# Altium PCB fotolitoTop.PcbDoc (part 1 of 4)
Units mil, origin at the board's own origin, x right, y up, seen from the top; angles counter-clockwise.
Board outline 7874.02 x 11220.47 mil, 2 copper layers (Top Layer, Bottom Layer); 110 components, 0 nets, 500 pads, 136 vias.
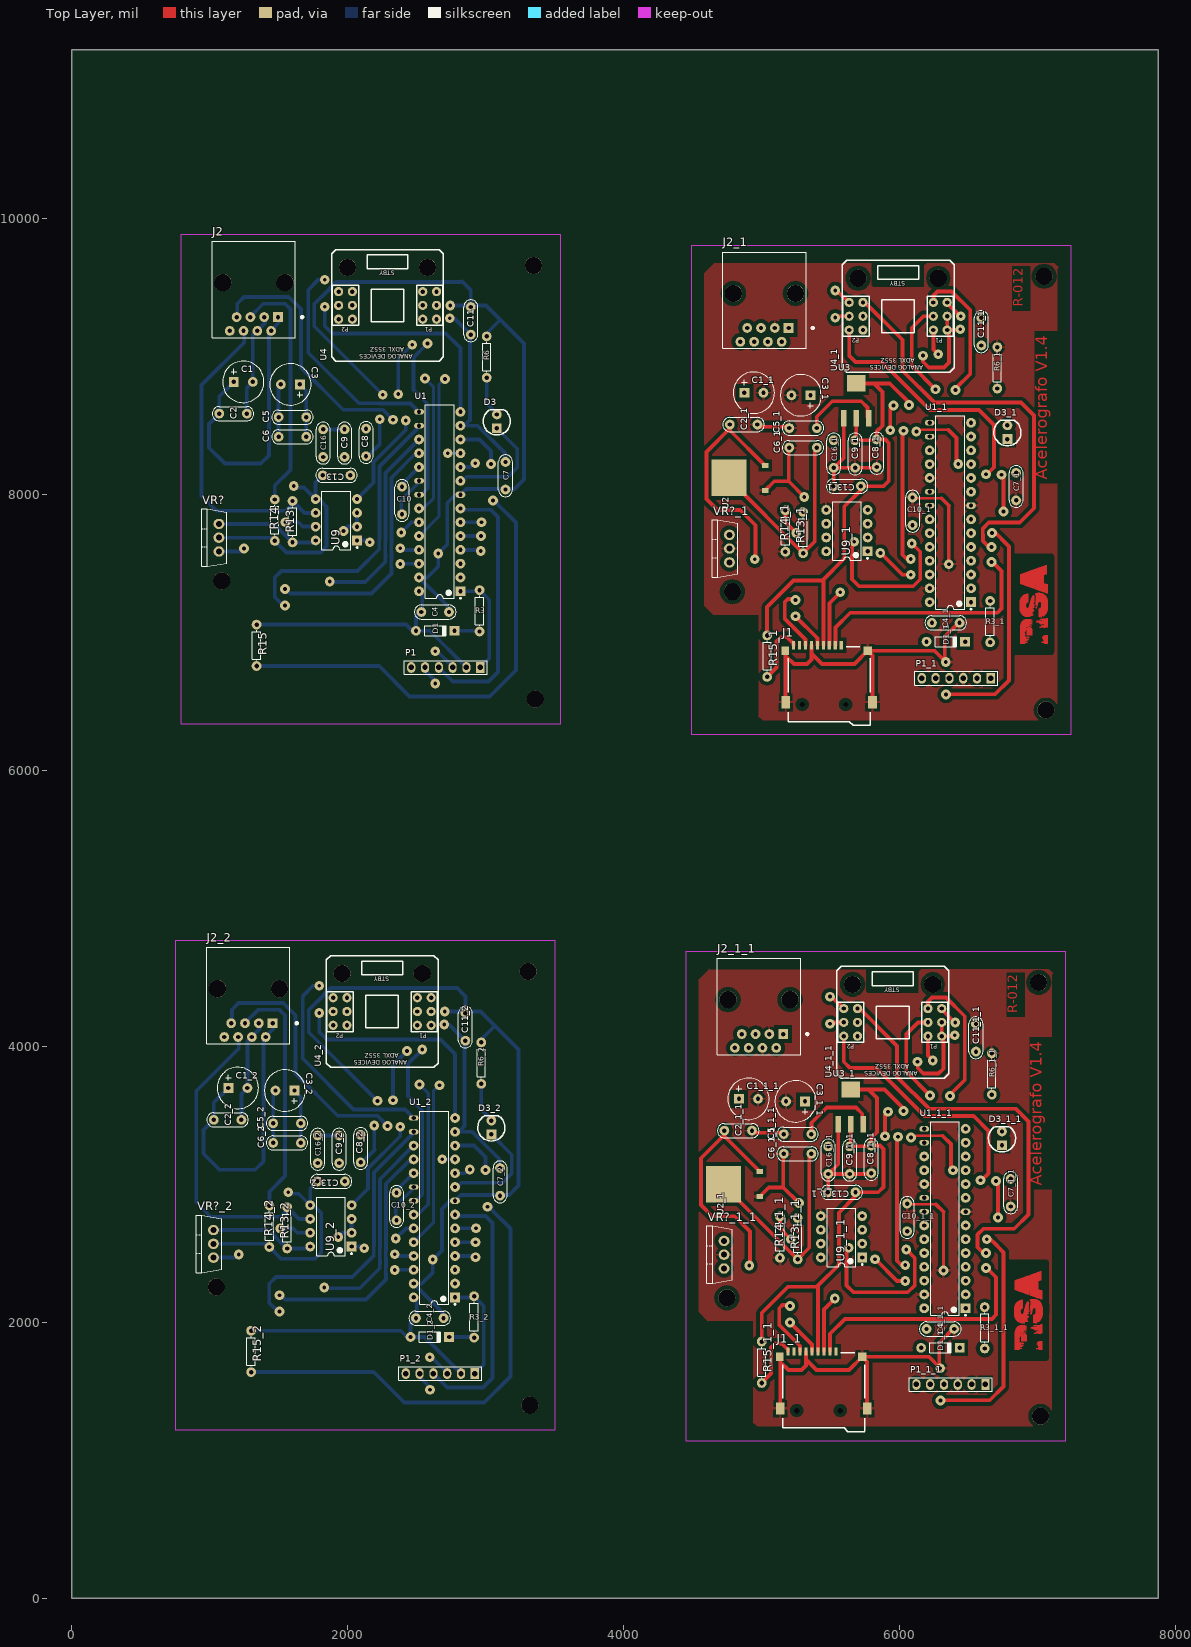
[diagram p0: Top Layer view]
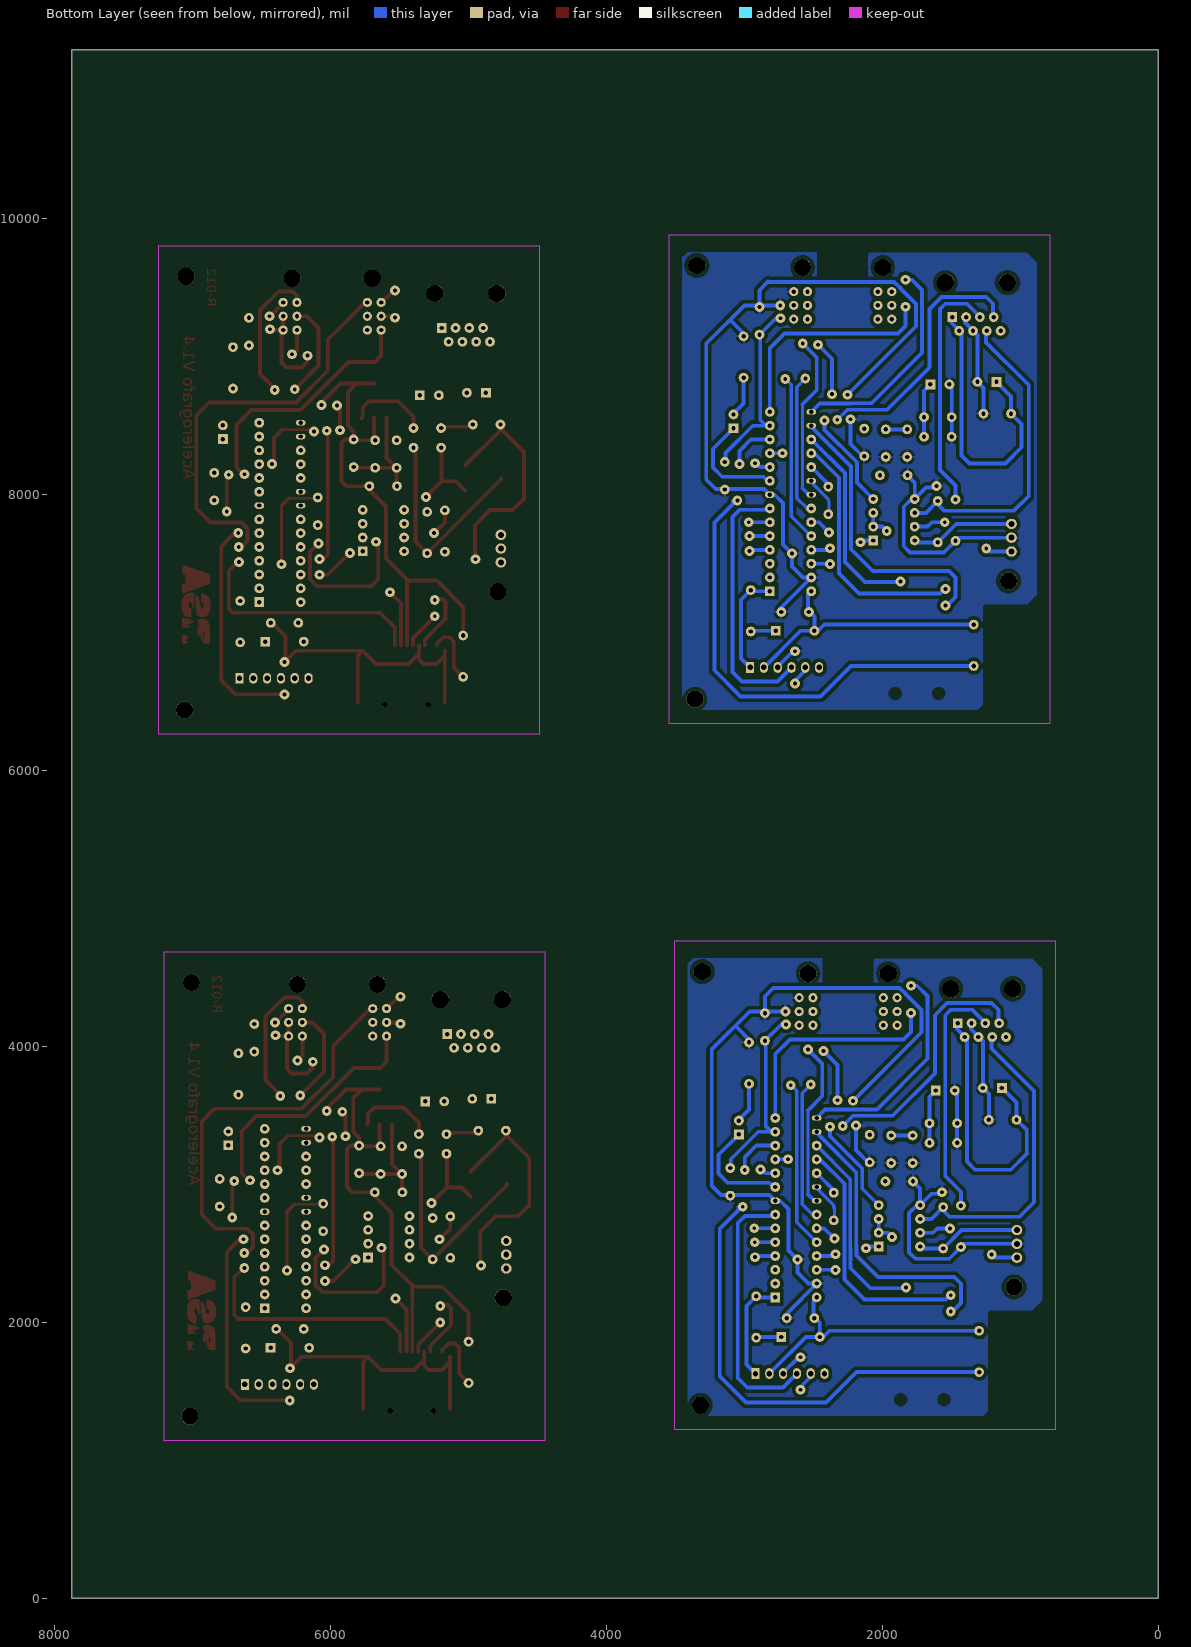
[diagram p1: Bottom Layer view, seen from below]

## Layer stack, top to bottom
Top Solder: solder mask 0.4, Solder Resist, Dk 3.5
Top Layer: signal copper 1.4
Dielectric 1: dielectric 12.6, FR-4, Dk 4.8
Bottom Layer: signal copper 1.4
Bottom Solder: solder mask 0.4, Solder Resist, Dk 3.5

## Board outline
0,0 7874.02,0 7874.02,11220.47 0,11220.47

## Design rules (kind name [scope] priority, off if disabled: settings)
Clearance [All] p1: gap=10
PolygonConnect [All] p1: connectstyle=Relief reliefconductorwidth=10 reliefentries=4 polygonreliefangle="90 Angle" airgapwidth=10
RoutingVias [All] p1: holewidth=28 width=50 viastyle="Through Hole" minholewidth=28 minwidth=50 maxholewidth=28 maxwidth=50
SolderMaskExpansion [All] p1: expansion=4
Width [All] p1: maxlimit=10 minlimit=10 preferedwidth=10
30 further rules are at their usual default settings.

## Components (designator, comment, footprint, x,y, rotation, side; value= is the part's Value field where it differs from the comment)
C1 "Cap" C100UFB 1173.16,8814.88 r0 top
C1_1 "Cap" C100UFB 4873.95,8736.13 r0 top (schematic designator C1)
C1_1_1 "Cap" C100UFB 4834.58,3618.02 r0 top (schematic designator C1)
C1_2 "Cap" C100UFB 1133.79,3696.76 r0 top (schematic designator C1)
C2 "Cap" RAD0.2 1067.41,8584.32 r0 top
C2_1 "Cap" RAD0.2 4768.2,8505.58 r0 top (schematic designator C2)
C2_1_1 "Cap" RAD0.2 4728.83,3387.47 r0 top (schematic designator C2)
C2_2 "Cap" RAD0.2 1028.04,3466.21 r0 top (schematic designator C2)
C3 "Cap" C100UFB 1651.98,8796.44 r180 top
C3_1 "Cap" C100UFB 5352.76,8717.7 r180 top (schematic designator C3)
C3_1_1 "Cap" C100UFB 5313.39,3599.59 r180 top (schematic designator C3)
C3_2 "Cap" C100UFB 1612.61,3678.33 r180 top (schematic designator C3)
C4 "Cap" RAD0.2 2532.57,7146.92 r0 top
C4_1 "Cap" RAD0.2 6233.36,7068.18 r0 top (schematic designator C4)
C4_1_1 "Cap" RAD0.2 6193.99,1950.07 r0 top (schematic designator C4)
C4_2 "Cap" RAD0.2 2493.2,2028.81 r0 top (schematic designator C4)
C5 "Cap" RAD0.2 1697.9,8559 r180 top
C5_1 "Cap" RAD0.2 5398.69,8480.26 r180 top (schematic designator C5)
C5_1_1 "Cap" RAD0.2 5359.32,3362.14 r180 top (schematic designator C5)
C5_2 "Cap" RAD0.2 1658.53,3440.89 r180 top (schematic designator C5)
C6 "Cap" RAD0.2 1697.9,8416.84 r180 top
C6_1 "Cap" RAD0.2 5398.69,8338.1 r180 top (schematic designator C6)
C6_1_1 "Cap" RAD0.2 5359.32,3219.99 r180 top (schematic designator C6)
C6_2 "Cap" RAD0.2 1658.53,3298.73 r180 top (schematic designator C6)
C7 "Cap" RAD0.2 3142.22,8234.62 r270 top
C7_1 "Cap" RAD0.2 6843.01,8155.88 r270 top (schematic designator C7)
C7_1_1 "Cap" RAD0.2 6803.64,3037.77 r270 top (schematic designator C7)
C7_2 "Cap" RAD0.2 3102.85,3116.51 r270 top (schematic designator C7)
C8 "Cap" RAD0.2 2131.66,8476.05 r270 top
C8_1 "Cap" RAD0.2 5832.45,8397.31 r270 top (schematic designator C8)
C8_1_1 "Cap" RAD0.2 5793.08,3279.2 r270 top (schematic designator C8)
C8_2 "Cap" RAD0.2 2092.29,3357.94 r270 top (schematic designator C8)
C9 "Cap" RAD0.2 1975.76,8470.67 r270 top
C9_1 "Cap" RAD0.2 5676.55,8391.93 r270 top (schematic designator C9)
C9_1_1 "Cap" RAD0.2 5637.18,3273.82 r270 top (schematic designator C9)
C9_2 "Cap" RAD0.2 1936.39,3352.56 r270 top (schematic designator C9)
C10 "Cap" RAD0.2 2392.01,7855.62 r90 top
C10_1 "Cap" RAD0.2 6092.8,7776.88 r90 top (schematic designator C10)
C10_1_1 "Cap" RAD0.2 6053.43,2658.77 r90 top (schematic designator C10)
C10_2 "Cap" RAD0.2 2352.64,2737.51 r90 top (schematic designator C10)
C11 "Cap" RAD0.2 2890.7,9157.49 r90 top
C11_1 "Cap" RAD0.2 6591.49,9078.75 r90 top (schematic designator C11)
C11_1_1 "Cap" RAD0.2 6552.12,3960.64 r90 top (schematic designator C11)
C11_2 "Cap" RAD0.2 2851.33,4039.38 r90 top (schematic designator C11)
C13 "Cap" RAD0.2 2017.55,8137.75 r180 top
C13_1 "Cap" RAD0.2 5718.33,8059.01 r180 top (schematic designator C13)
C13_1_1 "Cap" RAD0.2 5678.96,2940.9 r180 top (schematic designator C13)
C13_2 "Cap" RAD0.2 1978.18,3019.64 r180 top (schematic designator C13)
C16 "Cap" RAD0.2 1820.28,8470.67 r270 top
C16_1 "Cap" RAD0.2 5521.06,8391.93 r270 top (schematic designator C16)
C16_1_1 "Cap" RAD0.2 5481.69,3273.82 r270 top (schematic designator C16)
C16_2 "Cap" RAD0.2 1780.91,3352.56 r270 top (schematic designator C16)
D1 "1N914" DO-35 2632.94,7010.51 r0 top
D1_1 "1N914" DO-35 6333.72,6931.77 r0 top (schematic designator D1)
D1_1_1 "1N914" DO-35 6294.35,1813.66 r0 top (schematic designator D1)
D1_2 "1N914" DO-35 2593.57,1892.4 r0 top (schematic designator D1)
D3 "LED3" LED2 3079.37,8528.59 r90 top
D3_1 "LED3" LED2 6780.16,8449.85 r90 top (schematic designator D3)
D3_1_1 "LED3" LED2 6740.79,3331.74 r90 top (schematic designator D3)
D3_2 "LED3" LED2 3040,3410.48 r90 top (schematic designator D3)
J1 "ValueValueAux" microSD 5576.26,6905.66 r180 top
J1_1 "ValueValueAux" microSD 5536.89,1787.55 r180 top (schematic designator J1)
J2 "54602-908LF" *AMPHENOL_54602-908LF 1318.35,9534.37 r180 top
J2_1 "54602-908LF" *AMPHENOL_54602-908LF 5019.14,9455.63 r180 top (schematic designator J2)
J2_1_1 "54602-908LF" *AMPHENOL_54602-908LF 4979.77,4337.52 r180 top (schematic designator J2)
J2_2 "54602-908LF" *AMPHENOL_54602-908LF 1278.98,4416.26 r180 top (schematic designator J2)
P1 "Grabador" HDR1X6 2958.97,6745.02 r180 top
P1_1 "Grabador" HDR1X6 6659.76,6666.28 r180 top (schematic designator P1)
P1_1_1 "Grabador" HDR1X6 6620.39,1548.16 r180 top (schematic designator P1)
P1_2 "Grabador" HDR1X6 2919.6,1626.91 r180 top (schematic designator P1)
R3 "Res1" AXIAL-0.3#1 2954.09,7155.53 r270 top
R3_1 "Res1" AXIAL-0.3#1 6654.87,7076.79 r270 top (schematic designator R3)
R3_1_1 "Res1" AXIAL-0.3#1 6615.5,1958.68 r270 top (schematic designator R3)
R3_2 "Res1" AXIAL-0.3#1 2914.72,2037.42 r270 top (schematic designator R3)
R6 "Res1" AXIAL-0.3#1 3006,8995.22 r90 top
R6_1 "Res1" AXIAL-0.3#1 6706.79,8916.48 r90 top (schematic designator R6)
R6_1_1 "Res1" AXIAL-0.3#1 6667.42,3798.37 r90 top (schematic designator R6)
R6_2 "Res1" AXIAL-0.3#1 2966.63,3877.11 r90 top (schematic designator R6)
R13 "Res1" AXIAL-0.3#1 1598.72,7801.38 r270 top
R13_1 "Res1" AXIAL-0.3#1 5299.51,7722.64 r270 top (schematic designator R13)
R13_1_1 "Res1" AXIAL-0.3#1 5260.14,2604.53 r270 top (schematic designator R13)
R13_2 "Res1" AXIAL-0.3#1 1559.35,2683.27 r270 top (schematic designator R13)
R14 "Res1" AXIAL-0.3#1 1470.21,7812.39 r270 top
R14_1 "Res1" AXIAL-0.3#1 5171,7733.65 r270 top (schematic designator R14)
R14_1_1 "Res1" AXIAL-0.3#1 5131.63,2615.54 r270 top (schematic designator R14)
R14_2 "Res1" AXIAL-0.3#1 1430.84,2694.28 r270 top (schematic designator R14)
R15 "Res1" AXIAL-0.3#2 1337.91,6905.33 r90 top
R15_1 "Res1" AXIAL-0.3#2 5038.69,6826.59 r90 top (schematic designator R15)
R15_1_1 "Res1" AXIAL-0.3#2 4999.32,1708.48 r90 top (schematic designator R15)
R15_2 "Res1" AXIAL-0.3#2 1298.54,1787.22 r90 top (schematic designator R15)
U1 "DSPIC33EP256MC202-I/SP" MCHP-SPDIP-SP28 2665.75,7947.25 r180 top
U1_1 "DSPIC33EP256MC202-I/SP" MCHP-SPDIP-SP28 6366.53,7868.51 r180 top (schematic designator U1)
U1_1_1 "DSPIC33EP256MC202-I/SP" MCHP-SPDIP-SP28 6327.16,2750.4 r180 top (schematic designator U1)
U1_2 "DSPIC33EP256MC202-I/SP" MCHP-SPDIP-SP28 2626.38,2829.14 r180 top (schematic designator U1)
U2 "LM1117DT-5.0" *TO228P970X238-3N 4768.2,8118.51 r90 top
U2_1 "LM1117DT-5.0" *TO228P970X238-3N 4728.83,3000.4 r90 top (schematic designator U2)
U3 "LD33V" SOT-223 5593.63,8552.13 r0 top
U3_1 "LD33V" SOT-223 5554.26,3434.02 r0 top (schematic designator U3)
U4 "ADXL355Z" ADXL355Z 2287.52,9369.24 r180 top
U4_1 "ADXL355Z" ADXL355Z 5988.31,9290.5 r180 top (schematic designator U4)
U4_1_1 "ADXL355Z" ADXL355Z 5948.94,4172.39 r180 top (schematic designator U4)
U4_2 "ADXL355Z" ADXL355Z 2248.15,4251.13 r180 top (schematic designator U4)
U9 "MAX485" MAX485 2066.12,7665.49 r90 top
U9_1 "MAX485" MAX485 5766.91,7586.75 r90 top (schematic designator U9)
U9_1_1 "MAX485" MAX485 5727.54,2468.64 r90 top (schematic designator U9)
U9_2 "MAX485" MAX485 2026.75,2547.38 r90 top (schematic designator U9)
VR? "Volt Reg" TO-220V 1064.86,7585.27 r90 top
VR?_1 "Volt Reg" TO-220V 4765.65,7506.53 r90 top (schematic designator VR?)
VR?_1_1 "Volt Reg" TO-220V 4726.28,2388.42 r90 top (schematic designator VR?)
VR?_2 "Volt Reg" TO-220V 1025.49,2467.16 r90 top (schematic designator VR?)

## Footprints (in the part's own frame and the unit in brackets; to place one, negate y for a bottom-side part, rotate by r counter-clockwise, add the part's x,y. Pads: shape width x height; smd on the part's side, far side on the other; paste and mask are expansions set on the pad)
*AMPHENOL_54602-908LF [mm]
  rect 1.8x1.8 hole 0.8: 1(-4.445,6.35)
  round 1.8 hole 0.8: 2(-3.175,8.89) 3(-1.905,6.35) 4(-0.635,8.89) 5(0.635,6.35) 6(1.905,8.89) 7(3.175,6.35) 8(4.445,8.89)
  round 3.2 hole 3.2 unplated: None(-5.715,0) None(5.715,0)
  silkscreen extent -9.09,-7.62 7.65,10.12
*TO228P970X238-3N [mil]
  rect 35x48 smd: 1(-90,-256) 3(90,-256)
  rect 265x256 smd: 2(0,6)
ADXL355Z [mm]
  round 1.7 hole 0.8: 1(-6.48,2.54) 2(-6.48,0) 3(-6.48,-2.54) 4(-9.02,2.54) 5(-9.02,0) 6(-9.02,-2.54) 7(9.02,2.54) 8(9.02,0) 9(9.02,-2.54) 10(6.48,2.54) 11(6.48,0) 12(6.48,-2.54)
  round 0 all layers, no hole paste+0 mask+0: ""(-7.375,7) ""(7.375,7)
  round 3.15 hole 3.15: ""(-7.375,-7) ""(7.375,-7)
  silkscreen extent -10.29,-10.29 10.29,10.29
AXIAL-0.3#1 [mm] "Axial Device, Thru-Hole; 2 Leads; 0.3 in Pin Spacing"
  round 1.8 hole 0.8: 1(-3.81,0) 2(3.81,0)
  silkscreen extent -2.77,-0.76 2.77,0.76
AXIAL-0.3#2 [mm] "Axial Device, Thru-Hole; 2 Leads; 0.3 in Pin Spacing"
  round 1.8 hole 0.85 unplated: 1(-3.81,0) 2(3.81,0)
  silkscreen extent -2.77,-0.76 2.77,0.76
C100UFB [mm]
  rect 1.8x1.8 hole 0.8: 1(0,0)
  round 1.8 hole 0.8: 2(3.5,0)
  silkscreen extent -2.07,-3.81 5.55,3.81
DO-35 [mm] "Diode, Axial; Body 3.8 x 1.9 mm (LxDia. max), Lead Dia. 0.53 mm (max)"
  round 1.8 hole 0.8: 1(-3.55,0)
  rect 1.8x1.8 hole 0.8: 2(3.55,0)
  silkscreen extent -1.95,-0.95 2.05,0.95
HDR1X6 [mm] "Connector; Header; 6 Position"
  rect 1.5x2 hole 1: 1(0,0)
  oval 1.5x2 hole 1: 2(2.54,0) 3(5.08,0) 4(7.62,0) 5(10.16,0) 6(12.7,0)
  silkscreen extent -1.27,-1.27 13.97,1.27
LED2 [mm]
  rect 1.8x1.8 hole 0.8: 1(-1.27,0)
  round 1.8 hole 0.8: 2(1.27,0)
  silkscreen extent -2.5,-2.5 2.17,2.5
MAX485 [mm]
  rect 1.8x1.8 hole 0.8: 1(0,0)
  round 1.8 hole 0.8: 2(2.54,0) 3(5.08,0) 4(7.62,0) 5(7.62,7.62) 6(5.08,7.62) 7(2.54,7.62) 8(0,7.62)
  silkscreen extent -1.69,-0.13 9.1,6.46, body extent -1.64,0.2 9,7.41, height 5.34
MCHP-SPDIP-SP28 [mm] "DIP, 28-Leads, Body 34.86x6.79mm, Pitch 2.54mm"
  rect 1.8x1.8 hole 0.8: 1(-3.81,16.51)
  round 1.8 hole 0.8: 2(-3.81,13.97) 3(-3.81,11.43) 4(-3.81,8.89) 5(-3.81,6.35) 6(-3.81,3.81) 7(-3.81,1.27) 9(-3.81,-3.81) 10(-3.81,-6.35) 11(-3.81,-8.89) 12(-3.81,-11.43) 13(-3.81,-13.97) 14(-3.81,-16.51) 17(3.81,-11.43) 18(3.81,-8.89) 19(3.81,-6.35) 22(3.81,1.27) 23(3.81,3.81) 24(3.81,6.35) 25(3.81,8.89) 26(3.81,11.43) 27(3.81,13.97) 28(3.81,16.51)
  oval 1.8x1.2 hole 0.8: 8(-3.81,-1.27)
  oval 1.8x1 hole 0.8: 15(3.81,-16.51) 16(3.81,-13.97) 20(3.81,-3.81) 21(3.81,-1.27)
  silkscreen extent -3.94,-17.8 2.65,17.93, body extent -3.95,-17.77 3.95,17.77, height 5.08
microSD [mm]
  rect 0.6x1.5 smd: 1(0,0) 2(1.1,0) 3(2.2,0) 4(3.3,0) 5(4.4,0) 6(5.5,0) 7(6.6,0) 8(7.7,0) 9(8.8,0)
  rect 1.6x2.26 smd: 10(-5.75,10.5) 10(10.25,10.5)
  rect 1.6x1.6 smd: 10(-4.85,1)
  rect 1.4x1.6 smd: 10(10.3,1)
  round 0.8 hole 1: ""(-0.8,10.9) ""(7.2,10.9)
  silkscreen extent -5.33,0.25 9.8,14.75, body extent -5.75,-0.35 10.25,14.9, height 1.95
RAD0.2 [mm]
  round 1.8 hole 0.8: 1(0,0) 2(5.08,0)
  silkscreen extent -1.3,-1.3 6.38,1.3
SOT-223 [mm]
  rect 1x3 smd: 1(4.6,0) 2(0,0) 3(2.3,0)
  rect 3.4x3 smd: 3(2.3,6.4)
  body extent -1.2,1.41 5.8,5, height 1.1
TO-220V [mm] "D2-PAK, 4-Leads, Body 8.8x10.4mm, Pitch 2.54mm, Lead Span 15.1mm, IPC Medium Density"
  oval 1.9x2 hole 1.1: 1(0,0) 2(2.54,0) 3(5.08,0)
  silkscreen extent -2.75,-1.48 7.83,3.18, body extent -2.56,-1.8 7.6,2.8, height 18.9

## Part data
C1 C1_1 C1_1_1 C1_2 C2 C2_1 C2_1_1 C2_2 C3 C3_1 C3_1_1 C3_2 C4 C4_1 C4_1_1 C4_2 C5 C5_1 C5_1_1 C5_2 C6 C6_1 C6_1_1 C6_2 C7 C7_1 C7_1_1 C7_2 C8 C8_1 C8_1_1 C8_2 C9 C9_1 C9_1_1 C9_2 C10 C10_1 C10_1_1 C10_2 C11 C11_1 C11_1_1 C11_2 C13 C13_1 C13_1_1 C13_2 C16 C16_1 C16_1_1 C16_2: "Capacitor"
D1 D1_1 D1_1_1 D1_2: library part "Diode 1N914", "High Conductance Fast Diode"
D3 D3_1 D3_1_1 D3_2: "Typical BLUE SiC LED"
J1 J1_1: library part MICROSD, "=Description"
J2 J2_1 J2_1_1 J2_2: "Jack Modular Connector 8p8c _RJ45, Ethernet_ 90° Angle _Right_ Unshielded Cat3"
P1 P1_1 P1_1_1 P1_2: library part "Header 6", "Header, 6-Pin"
R3 R3_1 R3_1_1 R3_2 R6 R6_1 R6_1_1 R6_2 R13 R13_1 R13_1_1 R13_2 R14 R14_1 R14_1_1 R14_2 R15 R15_1 R15_1_1 R15_2: "Resistor"
U1 U1_1 U1_1_1 U1_2: "16-Bit Microcontroller and Digital Signal Controller with High-Speed PWM, Op Amps and Advanced Analog, 70 MIPS, 21 I/O, GPIO, -40 to 85 degC, 28-pin SPDIP (SP28), Tube"
U2 U2_1: "Linear Voltage Regulator IC 1 Output 800mA TO-252-3"
U3 U3_1: "High-Performance 16-bit Digital Signal Controller, 24 KB Flash, 2 KB SRAM, 1 KB EEPROM, 40-Pin PDIP, Industrial Temperature"
VR? VR?_1 VR?_1_1 VR?_2: "Voltage Regulator"

## Free pads (board coordinates)
  round 124.02 hole 124.02: ""(1046.21,2254.54) ""(1085.58,7372.65) ""(3306.05,4540.86) ""(3318.78,1397.57) ""(3345.42,9658.97) ""(3358.15,6515.68) ""(4747,2175.8) ""(4786.37,7293.91) ""(7006.84,4462.12) ""(7019.57,1318.83) ""(7046.21,9580.23) ""(7058.94,6436.94)

## Via types
v1: diameter 70.87, hole 27.56, Top Layer to Bottom Layer, 136 vias

## Nets (pads, with @x,y where several pads share a name; then routed paths per layer and width w, separated by ;. In a path a pad name is that pad's centre, name@x,y a point inside that pad or via, vN(x,y) a via of type N, cw(c..) or ccw(c..) an arc to the next point about the centre after c; other vN are vias at no path point)
pads on no net: C1.1 C1.2 C1_1.1 C1_1.2 C1_1_1.1 C1_1_1.2 C1_2.1 C1_2.2 C2.1 C2.2 C2_1.1 C2_1.2 C2_1_1.1 C2_1_1.2 C2_2.1 C2_2.2 C3.1 C3.2 C3_1.1 C3_1.2 C3_1_1.1 C3_1_1.2 C3_2.1 C3_2.2 C4.1 C4.2 C4_1.1 C4_1.2 C4_1_1.1 C4_1_1.2 C4_2.1 C4_2.2 C5.1 C5.2 C5_1.1 C5_1.2 C5_1_1.1 C5_1_1.2 C5_2.1 C5_2.2 C6.1 C6.2 C6_1.1 C6_1.2 C6_1_1.1 C6_1_1.2 C6_2.1 C6_2.2 C7.1 C7.2 C7_1.1 C7_1.2 C7_1_1.1 C7_1_1.2 C7_2.1 C7_2.2 C8.1 C8.2 C8_1.1 C8_1.2 C8_1_1.1 C8_1_1.2 C8_2.1 C8_2.2 C9.1 C9.2 C9_1.1 C9_1.2 C9_1_1.1 C9_1_1.2 C9_2.1 C9_2.2 C10.1 C10.2 C10_1.1 C10_1.2 C10_1_1.1 C10_1_1.2 C10_2.1 C10_2.2 C11.1 C11.2 C11_1.1 C11_1.2 C11_1_1.1 C11_1_1.2 C11_2.1 C11_2.2 C13.1 C13.2 C13_1.1 C13_1.2 C13_1_1.1 C13_1_1.2 C13_2.1 C13_2.2 C16.1 C16.2 C16_1.1 C16_1.2 C16_1_1.1 C16_1_1.2 C16_2.1 C16_2.2 D1.1 D1.2 D1_1.1 D1_1.2 D1_1_1.1 D1_1_1.2 D1_2.1 D1_2.2 D3.1 D3.2 D3_1.1 D3_1.2 D3_1_1.1 D3_1_1.2 D3_2.1 D3_2.2 J1. J1.1 J1.2 J1.3 J1.4 J1.5 J1.6 J1.7 J1.8 J1.9 J1.10 J1_1. J1_1.1 J1_1.2 J1_1.3 J1_1.4 J1_1.5 J1_1.6 J1_1.7 J1_1.8 J1_1.9 J1_1.10 J2.1 J2.2 J2.3 J2.4 J2.5 J2.6 J2.7 J2.8 J2.None J2_1.1 J2_1.2 J2_1.3 J2_1.4 J2_1.5 J2_1.6 J2_1.7 J2_1.8 J2_1.None J2_1_1.1 J2_1_1.2 J2_1_1.3 J2_1_1.4 J2_1_1.5 J2_1_1.6 J2_1_1.7 J2_1_1.8 J2_1_1.None J2_2.1 J2_2.2 J2_2.3 J2_2.4 J2_2.5 J2_2.6 J2_2.7 J2_2.8 J2_2.None P1.1 P1.2 P1.3 P1.4 P1.5 P1.6 P1_1.1 P1_1.2 P1_1.3 P1_1.4 P1_1.5 P1_1.6 P1_1_1.1 P1_1_1.2 P1_1_1.3 P1_1_1.4 P1_1_1.5 P1_1_1.6 P1_2.1 P1_2.2 P1_2.3 P1_2.4 P1_2.5 P1_2.6 R3.1 R3.2 R3_1.1 R3_1.2 R3_1_1.1 R3_1_1.2 R3_2.1 R3_2.2 R6.1 R6.2 R6_1.1 R6_1.2 R6_1_1.1 R6_1_1.2 R6_2.1 R6_2.2 R13.1 R13.2 R13_1.1 R13_1.2 R13_1_1.1 R13_1_1.2 R13_2.1 R13_2.2 R14.1 R14.2 R14_1.1 R14_1.2 R14_1_1.1 R14_1_1.2 R14_2.1 R14_2.2 R15.1 R15.2 R15_1.1 R15_1.2 R15_1_1.1 R15_1_1.2 R15_2.1 R15_2.2 U1.1 U1.2 U1.3 U1.4 U1.5 U1.6 U1.7 U1.8 U1.9 U1.10 U1.11 U1.12 U1.13 U1.14 U1.15 U1.16 U1.17 U1.18 U1.19 U1.20 U1.21 U1.22 U1.23 U1.24 U1.25 U1.26 U1.27 U1.28 U1_1.1 U1_1.2 U1_1.3 U1_1.4 U1_1.5 U1_1.6 U1_1.7 U1_1.8 U1_1.9 U1_1.10 U1_1.11 U1_1.12 U1_1.13 U1_1.14 U1_1.15 U1_1.16 U1_1.17 U1_1.18 U1_1.19 U1_1.20 U1_1.21 U1_1.22 U1_1.23 U1_1.24 U1_1.25 U1_1.26 U1_1.27 U1_1.28 U1_1_1.1 U1_1_1.2 U1_1_1.3 U1_1_1.4 U1_1_1.5 U1_1_1.6 U1_1_1.7 U1_1_1.8 U1_1_1.9 U1_1_1.10 U1_1_1.11 U1_1_1.12 U1_1_1.13 U1_1_1.14 U1_1_1.15 U1_1_1.16 U1_1_1.17 U1_1_1.18 U1_1_1.19 U1_1_1.20 U1_1_1.21 U1_1_1.22 U1_1_1.23 U1_1_1.24 U1_1_1.25 U1_1_1.26 U1_1_1.27 U1_1_1.28 U1_2.1 U1_2.2 U1_2.3 U1_2.4 U1_2.5 U1_2.6 U1_2.7 U1_2.8 U1_2.9 U1_2.10 U1_2.11 U1_2.12 U1_2.13 U1_2.14 U1_2.15 U1_2.16 U1_2.17 U1_2.18 U1_2.19 U1_2.20 U1_2.21 U1_2.22 U1_2.23 U1_2.24 U1_2.25 U1_2.26 U1_2.27 U1_2.28 U2.1 U2.2 U2.3 U2_1.1 U2_1.2 U2_1.3 U3.1 U3.2 U3.3 U3_1.1 U3_1.2 U3_1.3 U4. U4.1 U4.2 U4.3 U4.4 U4.5 U4.6 U4.7 U4.8 U4.9 U4.10 U4.11 U4.12 U4_1. U4_1.1 U4_1.2 U4_1.3 U4_1.4 U4_1.5 U4_1.6 U4_1.7 U4_1.8 U4_1.9 U4_1.10 U4_1.11 U4_1.12 U4_1_1. U4_1_1.1 U4_1_1.2 U4_1_1.3 U4_1_1.4 U4_1_1.5 U4_1_1.6 U4_1_1.7 U4_1_1.8 U4_1_1.9 U4_1_1.10 U4_1_1.11 U4_1_1.12 U4_2. U4_2.1 U4_2.2 U4_2.3 U4_2.4 U4_2.5 U4_2.6 U4_2.7 U4_2.8 U4_2.9 U4_2.10 U4_2.11 U4_2.12 U9.1 U9.2 U9.3 U9.4 U9.5 U9.6 U9.7 U9.8 U9_1.1 U9_1.2 U9_1.3 U9_1.4 U9_1.5 U9_1.6 U9_1.7 U9_1.8 U9_1_1.1 U9_1_1.2 U9_1_1.3 U9_1_1.4 U9_1_1.5 U9_1_1.6 U9_1_1.7 U9_1_1.8 U9_2.1 U9_2.2 U9_2.3 U9_2.4 U9_2.5 U9_2.6 U9_2.7 U9_2.8 VR?.1 VR?.2 VR?.3 VR?_1.1 VR?_1.2 VR?_1.3 VR?_1_1.1 VR?_1_1.2 VR?_1_1.3 VR?_2.1 VR?_2.2 VR?_2.3
copper on no net: | length 265925
  Top Layer w0.59: 6995.5,2178.09 6995.5,2357.09 ; 7034.87,7296.2 7034.87,7475.2